# Altium PCB PCB.PcbDoc
Units mm, origin at the board's own origin, x right, y up, seen from the top; angles counter-clockwise.
Board outline 200 x 149.9 mm, 2 copper layers (Top Layer, Bottom Layer); 38 components, 35 nets, 168 pads, 4 vias.
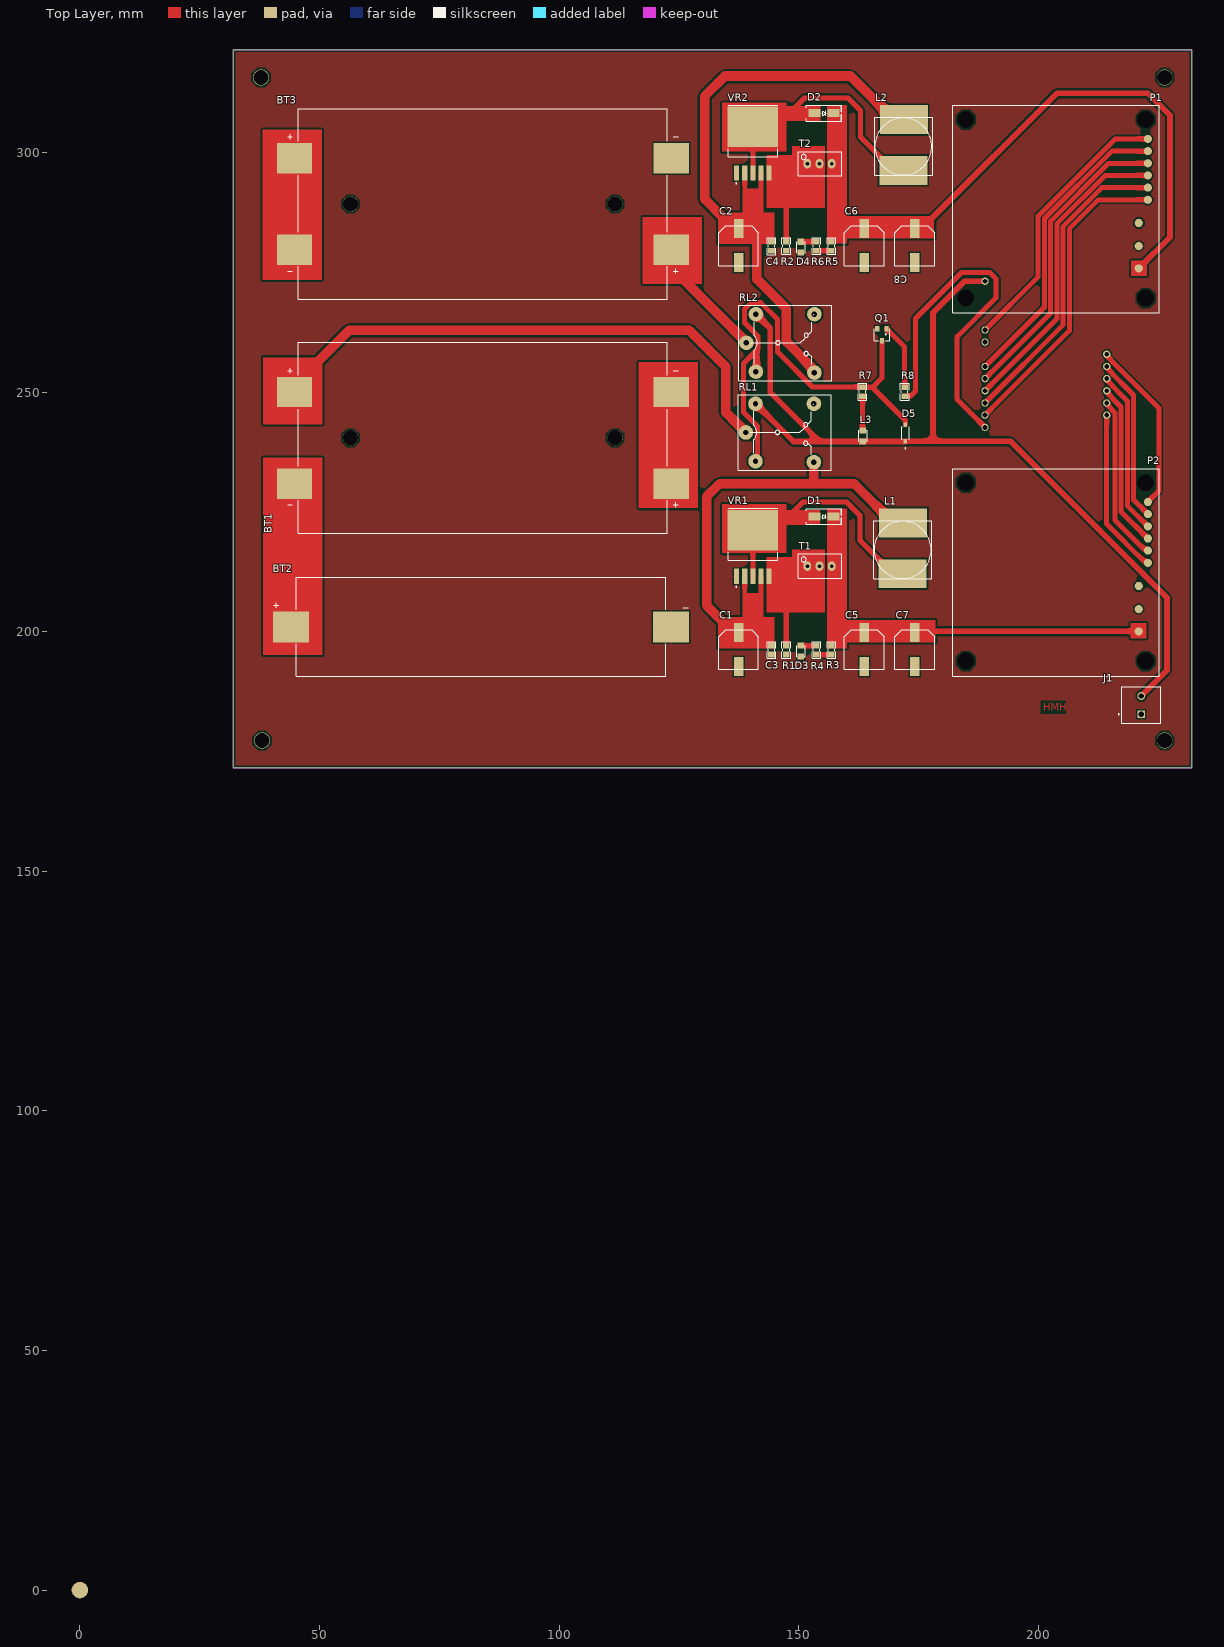
[diagram p0: Top Layer view]
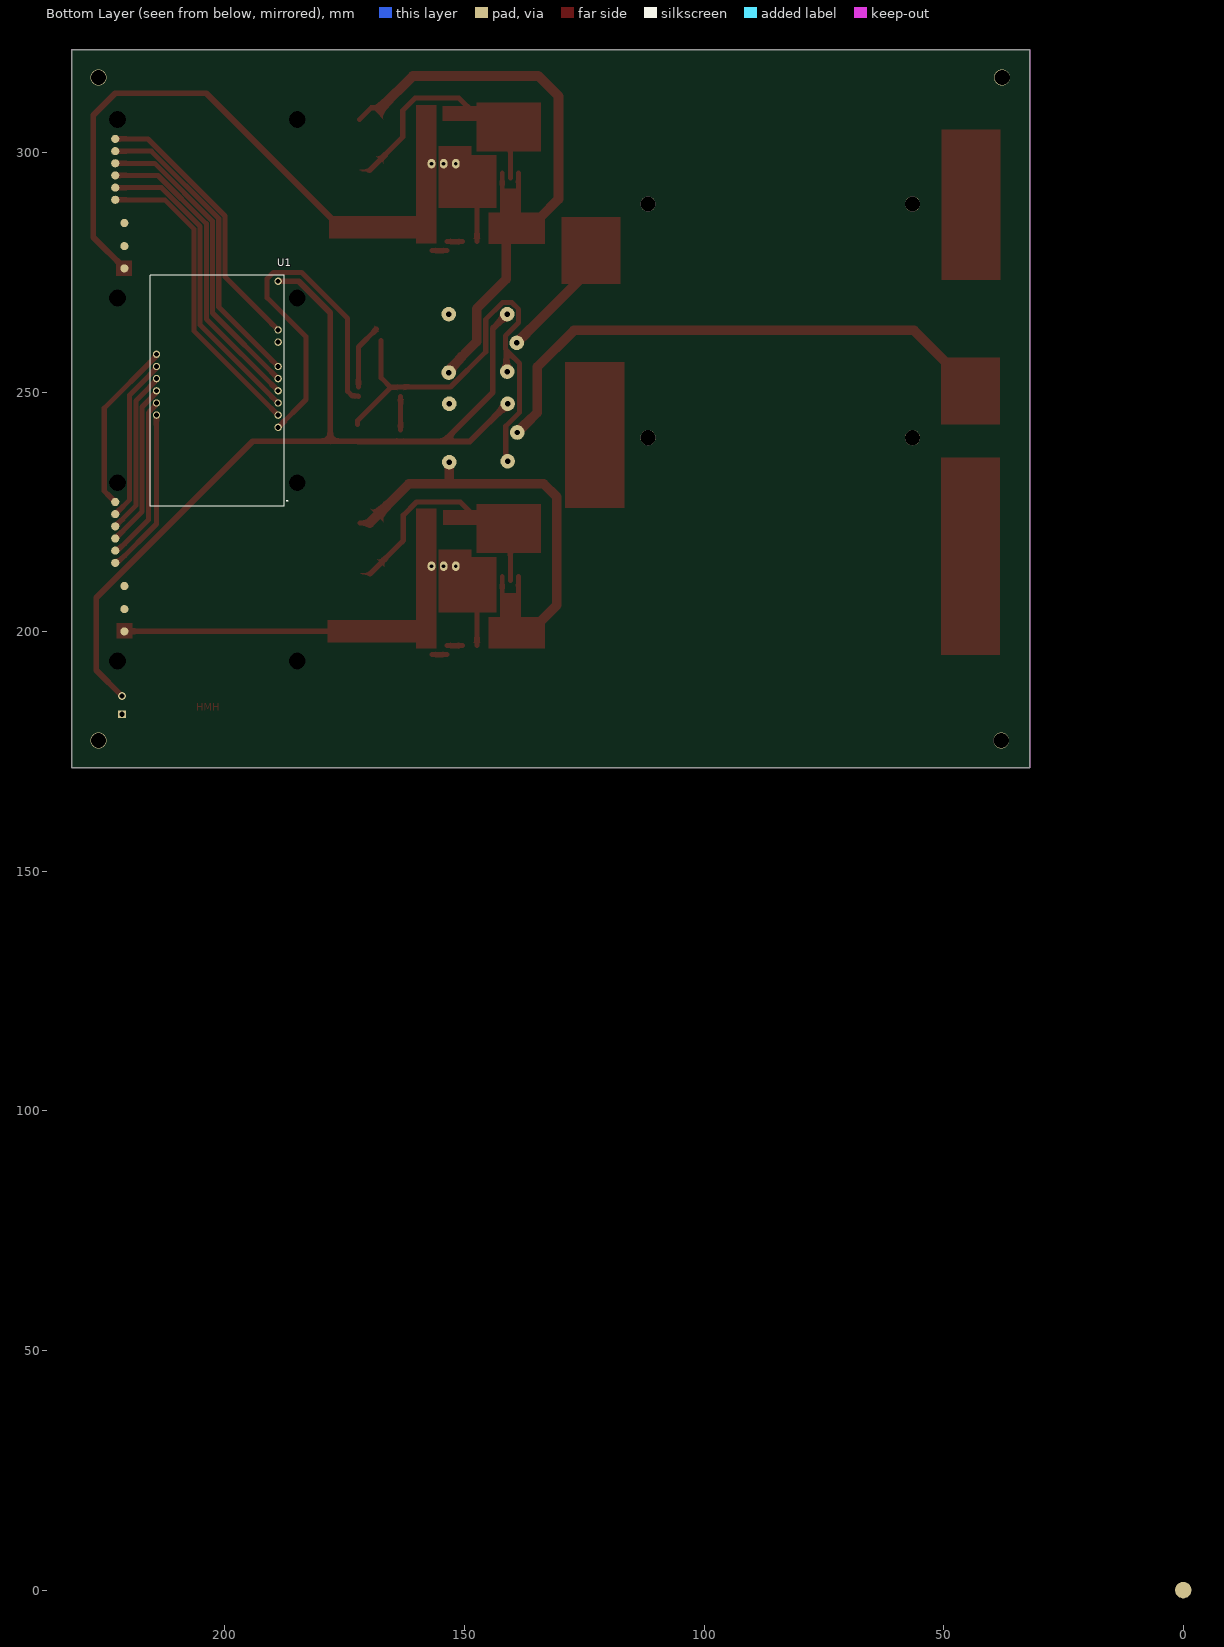
[diagram p1: Bottom Layer view, seen from below]

## Layer stack, top to bottom
Top Solder: solder mask 0.0102, Solder Resist, Dk 3.5
Top Layer: signal copper 0.0356
Dielectric 1: dielectric 0.32, FR-4, Dk 4.8
Bottom Layer: signal copper 0.0356
Bottom Solder: solder mask 0.0102, Solder Resist, Dk 3.5

## Board outline
32,171.6 32,321.5 232,321.5 232,171.6

## Design rules (kind name [scope] priority, off if disabled: settings)
Clearance TB6612FNG [InNet('0')or InNet('33')or InNet('25')or InNet('26')or InNet('27')or InNet('14')or InNet('13')or InNet('4')or InNet('16')or InNet('17')or InNet('5')or InNet('18')or InNet('19')or InNet('3V3')] p1: gap=0.25 ignorepadtopadclearanceinfootprint=FALSE
Clearance [All] p2: gap=0.35 ignorepadtopadclearanceinfootprint=FALSE
PolygonConnect [All] p1: connectstyle=Relief reliefconductorwidth=0.254 reliefentries=4 polygonreliefangle="90 Angle" airgapwidth=0.254
RoutingVias [All] p1: holewidth=0.711 width=1.27 viastyle="Through Hole" minholewidth=0.711 minwidth=1.27 maxholewidth=0.711 maxwidth=1.27
SolderMaskExpansion [All] p1: expansion=0.102 istentingtop=FALSE
Width PIN3 [InNet('PIN3') OR InNet('PIN3N')] p1: maxlimit=1.5 minlimit=0.6 preferedwidth=1
Width GND [InNet('GND')] p2: maxlimit=0.001 minlimit=0.001 preferedwidth=0.001
Width motor [InNet('motor 1') OR InNet('motor 2') OR InNet('motor 3') OR InNet('motor 4') OR InNet('motor 5') OR InNet('motor 6') OR InNet('motor 7') OR InNet('motor 8')] p3: maxlimit=2.5 minlimit=0.9 preferedwidth=0.9
Width "PIN1 + PIN2" [InNet('PIN1') OR InNet('RELAYPIN1') OR InNet('PIN2') OR InNet('RELAYPIN2')] p4: maxlimit=2 minlimit=0.8 preferedwidth=1
Width 12v/1 [InNet('12V/1')] p5: maxlimit=2 minlimit=1 preferedwidth=1.2
Width 12v/2 [InNet('12V/2')] p6: maxlimit=2 minlimit=1 preferedwidth=1.2
Width 5V [InNet('5V')] p7: maxlimit=1.2 minlimit=1.2 preferedwidth=1.2
Width 3V3 [InNet('3V3')] p8: maxlimit=0.5 minlimit=0.3 preferedwidth=0.4
30 further rules are at their usual default settings.

## Classes and differential pairs
component class Sheet: 3 C1 C2 C3 C4 C5 C6 C7 C8 D1 D2 D3 D4 D5 J1 L1 L2 L3 L9 P1 P2 Q1 R1 R2 R3 R4 R5 R6 R7 R8 RL1 RL2 T1 T2 VR1 VR2

## Components (designator, comment, footprint, x,y, rotation, side; value= is the part's Value field where it differs from the comment)
BT1 "1048P" BAT_1048P#1 84.1,240.495 r0 top
BT2 "1042P" BAT_1042P 83.7,201.037 r180 top
BT3 "1048P" BAT_1048P#2 84.1,289.3 r180 top
C1 "220uF/25v" "tu nhom 8 (f)" 137.463,196.3 r270 top
C2 "220uF/25v" "tu nhom 8 (f)" 137.463,280.6 r270 top
C3 "100nF 50V" "Cap 0805" 144.363,196.199 r270 top
C4 "100nF 50V" "Cap 0805" 144.363,280.499 r270 top
C5 "220uF/25v" "tu nhom 8 (f)" 163.701,196.3 r270 top
C6 "220uF/25v" "tu nhom 8 (f)" 163.701,280.6 r270 top
C7 "220uF/25v" "tu nhom 8 (f)" 174.263,196.3 r270 top
C8 "220uF/25v" "tu nhom 8 (f)" 174.263,280.6 r270 top
D1 "SS54" "DIODE SMA" 155.3,224.051 r0 top
D2 "SS54" "DIODE SMA" 155.3,308.251 r0 top
D3 "LED 0805" LED-0805-Red 150.463,197.115 r270 top
D4 "LED 0805" LED-0805-Red 150.463,281.415 r270 top
D5 "1N4148W" SODFL3816X120N 172.3,241.5 r90 top
J1 "284392-2" TE_284392-2 221.5,184.7 r90 top
L1 "33uH-4,2A SMD" "Cuon Cam 12x12x10" 165.713,211.1 r0 top
L2 "33uH-4,2A SMD" "Cuon Cam 12x12x10" 165.851,295.3 r0 top
L3 "LED 0805" LED-0805-Red 163.401,239.732 r90 top
P1 "Motor L298N" L298N_Module 222.9,290.164 r90 top
P2 "Motor L298N" L298N_Module 222.9,214.397 r90 top
Q1 "S8050" SOT-23 167.4,262 r180 top
R1 "1k" "tro smd 0805" 147.363,196.202 r90 top
R2 "1k" "tro smd 0805" 147.363,280.502 r90 top
R3 "1k" "tro smd 0805" 156.763,196.202 r90 top
R4 "1k" "tro smd 0805" 153.763,196.202 r270 top
R5 "1k" "tro smd 0805" 156.763,280.502 r90 top
R6 "1k" "tro smd 0805" 153.763,280.502 r270 top
R7 "1k" "tro smd 0805" 163.401,250.1 r270 top
R8 "470" "tro smd 0805" 172.2,250.1 r270 top
RL1 "Relay" "Relay 5 Chan SRD" 139,241.6 r0 top
RL2 "Relay" "Relay 5 Chan SRD" 139.1,260.3 r0 top
T1 "10k" "Bien Tro Vi Chinh Dung" 154.36,213.7 r0 top
T2 "10k" "Bien Tro Vi Chinh Dung" 154.36,297.7 r0 top
U1 "ESP32-DEVKITC-32U" MODULE_ESP32-DEVKITC-32U 201.6,250.29 r0 bottom
VR1 "XL6009" DPAK170P1435X465-6N 140.453,217.688 r90 top
VR2 "XL6009" DPAK170P1435X465-6N 140.453,301.888 r90 top

## Footprints (in the part's own frame and the unit in brackets; to place one, negate y for a bottom-side part, rotate by r counter-clockwise, add the part's x,y. Pads: shape width x height; smd on the part's side, far side on the other; paste and mask are expansions set on the pad)
BAT_1042P [mm]
  rect 7.46x6.47 smd: N(-39.67,0) P(39.67,0)
  round 0 all layers, no hole: ""(27.6,8) ""(83.7,201.037)
  round 2.39 all layers, no hole: ""(83.7,201.037)
  silkscreen extent -43.25,-10.33 43.25,10.33, body extent -43,-10.33 43,10.33, height 14.86
BAT_1048P#1 [mm]
  rect 7.34x6.35 smd: N1(39.33,9.555) N2(-39.33,-9.555) P1(-39.33,9.555) P2(39.33,-9.555)
  round 2.39 all layers, no hole: ""(-84.1,-240.495)
  round 3.45 all layers, no hole: ""(-84.1,-240.495) ""(-84.1,-240.495)
  round 3.17 hole 3.17 unplated: ""(-27.6,0) ""(27.6,0)
  silkscreen extent -40.75,-19.89 40.75,19.89, body extent -43,-19.89 43,19.89, height 15.43
BAT_1048P#2 [mm]
  rect 7.34x6.35 smd: N1(39.33,9.555) N2(-39.33,-9.555) P1(-39.33,9.555) P2(39.33,-9.555)
  round 3.17 hole 3.17 unplated: ""(-27.6,0) ""(27.6,0)
  round 3.45 all layers, no hole: ""(84.1,289.3) ""(84.1,289.3)
  round 2.39 all layers, no hole: ""(84.1,289.3)
  silkscreen extent -40.75,-19.89 40.75,19.89, body extent -43,-19.89 43,19.89, height 15.43
"Bien Tro Vi Chinh Dung" [mm] "Bien tro vi chinh"
  oval 1.6x2 hole 0.8: 1(-2.54,0) 2(0,0) 3(2.54,0)
  silkscreen extent -4.47,-2.54 4.6,2.54, body extent -4.54,-2.4 4.66,2.4, height 12.02
"Cap 0805" [mm] "Compoment SMD 80x50mil"
  rect 1.2x1.4 smd: 1(-0.946,-0.003) 2(0.954,-0.003)
  silkscreen extent -1.75,-0.89 1.75,0.89, body extent -0.97,-0.61 1.03,0.64, height 1.23
"Cuon Cam 12x12x10" [mm] "Cuon Cam 12x12x10"
  rect 10x6 smd: 1(6.1,11.6) 2(6,1)
  silkscreen extent 0,0 12.1,12.1, body extent 0.1,-0.2 12.1,12.14, height 7.51
"DIODE SMA" [mm] "SMA"
  rect 2.5x1.7 smd: 1(-2,0) 2(2,0)
  silkscreen extent -3.68,-1.65 3.75,1.65, body extent -2.6,-1.37 2.6,1.37, height 2.4
DPAK170P1435X465-6N [mm]
  rect 3.21x1.05 smd: 1(-6.13,3.4) 2(-6.13,1.7) 3(-6.13,0) 4(-6.13,-1.7) 5(-6.13,-3.4)
  rect 8.46x10.53 smd paste-6: 6(3.5,0)
  silkscreen extent -8.4,-5.18 8.05,5.18, body extent -7.17,-5.08 7.17,5.08, height 4.65
L298N_Module [mm]
  round 1.7 all layers, no hole: 1(0,0) 2(2.54,0) 3(5.08,0) 4(7.62,0) 5(10.16,0) 6(12.7,0) 7(-14.301,1.905) 8(-9.661,1.905) 9(-4.841,1.905)
  round 1.524 hole 3.5: 16(-20.518,0.476) 17(-20.518,38) 18(16.736,38) 19(16.736,0.476)
  silkscreen extent -23.62,-2.41 19.68,40.77, body extent -23.69,-2.7 19.81,40.8, height 26
LED-0805-Red [mil]
  rect 50x55 smd: 1(0,0) 2(90,0)
  silkscreen extent 0,-35 90,35, body extent 5,-25 85,25, height 43
MODULE_ESP32-DEVKITC-32U [mm]
  rect 1.53x1.53 / inner round 1.53 / far side rect 1.53x1.53 all layers, no hole: 1(-201.6,250.29)
  round 1.53 all layers, no hole: 2(-201.6,250.29) 3(-201.6,250.29) 4(-201.6,250.29) 5(-201.6,250.29) 6(-201.6,250.29) 13(-201.6,250.29) 16(-201.6,250.29) 17(-201.6,250.29) 18(-201.6,250.29) 20(-201.6,250.29) 21(-201.6,250.29) 22(-201.6,250.29) 23(-201.6,250.29) 24(-201.6,250.29) 25(-201.6,250.29) 32(-201.6,250.29) 33(-201.6,250.29) 34(-201.6,250.29) 35(-201.6,250.29) 36(-201.6,250.29) 37(-201.6,250.29) 38(-201.6,250.29)
  round 1.53 hole 1.02: 7(-12.7,7.61) 8(-12.7,5.07) 9(-12.7,2.53) 10(-12.7,-0.01) 11(-12.7,-2.55) 12(-12.7,-5.09) 14(-12.7,-10.17) 15(-12.7,-12.71) 19(-12.7,-22.87) 26(12.7,-7.63) 27(12.7,-5.09) 28(12.7,-2.55) 29(12.7,-0.01) 30(12.7,2.53) 31(12.7,5.07)
  silkscreen extent -14.67,-24.1 13.95,24.1, body extent -13.95,-24.62 13.95,24.13, height 7.85
"Relay 5 Chan SRD" [mil] "Relay SPDT, 5 pin, 10A,W 650mil, L 800mil, H 800mil"
  round 120 hole 45: 1(0,0) 2(559.06,236.22) 3(559.06,-243.78) 4(78.74,-236.22) 5(78.74,236.22)
  silkscreen extent -63,-311 700,310, body extent -55,-306 697,304, height 602
SODFL3816X120N [mm]
  rect 0.97x0.73 smd paste+0 mask+0.102: A(1.72,0) C(-1.72,0)
  silkscreen extent -3.3,-0.8 1.35,0.8, body extent -1.94,-0.88 1.86,0.72, height 1.1
SOT-23 [mm] "SOT 23 _ 1-3-2"
  rect 0.85x1.2 smd: 1(-0.94,-1.245) 2(0.985,-1.25) 3(0.005,1.25)
  silkscreen extent -1.65,-1.27 1.65,1.27, body extent -1.47,-1.33 1.53,1.17, height 1.06
TE_284392-2 [mm]
  rect 1.65x1.65 / inner round 1.65 / far side rect 1.65x1.65 hole 1.1: 1(-1.905,0)
  round 1.65 hole 1.1: 2(1.905,0)
  silkscreen extent -3.8,-4.1 3.8,4.8, body extent -4.01,-4.1 4.11,4.1, height 14
"tro smd 0805" [mm]
  rect 1.2x1.4 smd: 1(-0.946,-0.061) 2(0.954,-0.061)
  silkscreen extent -1.75,-0.97 1.75,0.84, body extent -1.56,-0.76 1.44,0.64, height 0.53
"tu nhom 8 (f)" [mm]
  rect 4x2 smd: 1(-3.55,0) 2(3.55,0)
  silkscreen extent -4.15,-4.15 4.15,4.15, body extent -4.85,-4.25 4.85,4.25, height 10.5

## Part data
BT1 BT3: "SMT Polarized Holder for Dual 18650 Batteries", Package=None, Availability="In Stock", Check_prices=https://www.snapeda.com/parts/1048P/Keystone+Electronics/view-part/?ref=eda, MF="Keystone Electronics", MP=1048P, Price=None, Purchase-URL=https://pricing.snapeda.com/search/part/1048P/?ref=eda, SnapEDA_Link=https://www.snapeda.com/parts/1048P/Keystone+Electronics/view-part/?ref=snap
BT2: "SMT Polarized Battery Holder for 18650 Battery", Package=None, Check_prices=https://www.snapeda.com/parts/1042P/Keystone/view-part/?ref=eda, MF="Keystone Electronics", MP=1042P, SnapEDA_Link=https://www.snapeda.com/parts/1042P/Keystone/view-part/?ref=snap
C1 C2 C5 C6 C7 C8: library part "Tu Nhom 220uF 25V", "Dán", Chung_Loai=Dán, Don_Vi=Con, Ma_Hang=MH002221, So_Chan=2, Ten_Linh_Kien="Tụ Nhôm 220uF 25V"
C3 C4: library part "Cap 0805", "Capacitor SMD 0805"
D1 D2: library part "Diode SS34 ( 1N5822 )", "Dán", Chung_Loai=Dán, Don_Vi=Con, Ma_Hang=MH002104, Ten_Linh_Kien="Diode SS34 3A 40V SMA ( 1N5822 SS34A)"
D3 D4 L3: library part "LED 0805 Do", "Dán", Chung_Loai=Dán, Don_Vi=Con, Ma_Hang=MH000897, Ten_Linh_Kien="LED 0805 Màu Đỏ (Red)"
D5: "Small Signal Diode, SOD-123F, 100V, 0.15A, 150Â°C", Package="SOD-123F Diotec", Check_prices=https://www.snapeda.com/parts/1N4148W/Diotec/view-part/?ref=eda, MF="Diotec Semiconductor", MP=1N4148W, SnapEDA_Link=https://www.snapeda.com/parts/1N4148W/Diotec/view-part/?ref=snap
J1: "TERMI-BLOK PCB SIDE ENTRY STAC", Package=None, Check_prices=https://www.snapeda.com/parts/284392-2/TE+Connectivity+AMP+Connectors/view-part/?ref=eda, EU_RoHS_Compliance="Compliant with Exemptions", MF="TE Connectivity", MP=284392-2, SnapEDA_Link=https://www.snapeda.com/parts/284392-2/TE+Connectivity+AMP+Connectors/view-part/?ref=snap
L1 L2: library part "CUON CAM 100uH SMD", "Dán", Chung_Loai=Dán, Don_Vi=Con, Ten_Linh_Kien="Cuộn Cảm 100uH 7x7x4MM CD74"
Q1: library part SMD-TRANSISTORS-NPN-25V-500MW(SOT-23), "Bipolar (BJT) Transistor NPN 25 V 500 mA 150MHz 300 mW Surface Mount SOT-23", Package=None, Availability="In Stock", Check_prices=https://www.snapeda.com/parts/S8050/Umwelt+Sensor+Teknik/view-part/?ref=eda, MF=UMW, MP=S8050, Price=None, Purchase-URL=https://pricing.snapeda.com/search/part/S8050/?ref=eda, SnapEDA_Link=https://www.snapeda.com/parts/S8050/Umwelt+Sensor+Teknik/view-part/?ref=snap
R1 R2 R3 R4 R5 R6 R7 R8: library part "Tro 0805 1% 1k", "Dán", Chung_Loai=Dán, Don_Vi=Con, Ma_Hang=MH005468, So_Chan=2, Ten_Linh_Kien="Trở 0805 1% 1k"
RL1 RL2: library part "Relay 5 Chan SRD", "Relay 5 Chan", Ma_Hang=MH009374, Ten="Relay 5V10A SRD-05VDC-SL-C Chính Hãng"
T1 T2: library part "Bien Tro Tinh Chinh 10K Dung", "Cắm", Chung_Loai=Cắm, Don_Vi=Con, Ma_Hang=MH003232, Ten_Linh_Kien="Biến Trở VR 103-10K 3296W"
U1: "ESP32-WROOM-32UE series Transceiver; 802.11 b/g/n (Wi-Fi, WiFi, WLAN), Bluetooth® Smart Ready 4.x Dual Mode Evaluation Board", Package="CUSTOM-38 ESPRESSIF", Check_prices=https://www.snapeda.com/parts/ESP32-DEVKITC-32U/Espressif+Systems/view-part/?ref=eda, MF="Espressif Systems", MP=ESP32-DEVKITC-32U, SnapEDA_Link=https://www.snapeda.com/parts/ESP32-DEVKITC-32U/Espressif+Systems/view-part/?ref=snap
VR1 VR2: "The XL6009 regulator is a wide input range, current mode, DC/DC converter which is capable of generating either positive or negative output voltages.", Package="TO-263-5L XLSEMI", Availability="Not in stock", Check_prices=https://www.snapeda.com/parts/XL6009/XLSEMI/view-part/?ref=eda, MF=XLSEMI, MP=XL6009, Price=None, SnapEDA_Link=https://www.snapeda.com/parts/XL6009/XLSEMI/view-part/?ref=snap

## Via types
v1: diameter 3.3, hole 3.2, Top Layer to Bottom Layer, 4 vias

## Nets (pads, with @x,y where several pads share a name; then routed paths per layer and width w, separated by ;. In a path a pad name is that pad's centre, name@x,y a point inside that pad or via, vN(x,y) a via of type N, cw(c..) or ccw(c..) an arc to the next point about the centre after c; other vN are vias at no path point)
4: P2.6 U1.26 | length 36.3
  Top Layer w1.05: U1.26 214.392,257.828 214.392,257.466 225.2,246.658 225.2,229.397 P2.6
5: P2.3 U1.29 | length 34.4
  Top Layer w1.05: U1.29 214.392,250.208 214.392,249.846 217.3,246.938 217.3,233.257 217.299,233.256 217.299,229.011 217.3,229.01 217.3,225.077 P2.3
5V: D5.C J1.2 L3.1 RL1.5 RL2.5 U1.19 | length 197.9
  Top Layer w1.2: RL1.5 148.905,239.695 ; RL2.5 144.1,263.3 144.1,249.932 154.332,239.7 ; 148.905,239.7 154.332,239.7 ; L3.1@163.401,239.7 154.332,239.7 ; L3.1 D5.C@172.252,239.732 ; D5.C 178.041,239.78 ; U1.19 184.596,273.16 178.041,266.605 178.041,239.78 ; J1.2 226.88,191.985 226.88,207.12 194.22,239.78 178.041,239.78
12V/1: C5.1 C7.1 D1.2 P2.7 R3.2 T1.3 | length 43.7
  Top Layer w1.2: R3.2 R3.2@156.862,197.156 ; T1.3@156.862,213.662 T1.3 ; 177.6,200.5 177.6,200.496 178,200.096 P2.7
12V/2: C6.1 C8.1 D2.2 P1.7 R5.2 T2.3 | length 102.2
  Top Layer w1.2: T2.3@156.824,297.932 158,299.108 158,300.5 ; 176.9,283.5 176.9,284.3 ; 176.9,285.4 177.7,286.2 203.9,312.4 222.9,312.4 227.5,307.8 227.5,282.368 P1.7
13: P1.6 U1.15 | length 57.9
  Top Layer w1.05: U1.15 200,274.1 200,286.792 216.072,302.864 P1.6
14: P1.5 U1.12 | length 63.4
  Top Layer w1.05: U1.12 201.3,267.78 201.3,286.254 215.37,300.324 P1.5
16: P2.5 U1.27 | length 34.4
  Top Layer w1.05: U1.27 214.392,255.288 214.392,254.926 219.9,249.418 219.9,232.18 219.899,232.179 219.899,230.088 219.9,230.087 219.9,227.557 P2.5
17: P2.4 U1.28 | length 34.4
  Top Layer w1.05: U1.28 214.392,252.748 214.392,252.386 218.6,248.178 218.6,232.719 218.599,232.718 218.599,229.549 218.6,229.548 218.6,226.317 P2.4
18: P2.2 U1.30 | length 34.7
  Top Layer w1.05: U1.30 214.392,247.668 214.392,247.306 216,245.698 216,233.796 215.999,233.795 215.999,228.472 216,228.471 216,223.331 222.27,217.062 222.776,217.062 P2.2
19: P2.1 U1.31 | length 34.7
  Top Layer w1.05: U1.31 214.3,222.491 222.27,214.522 222.776,214.522 P2.1
25: P1.2 U1.9 | length 64.7
  Top Layer w1.05: U1.9 205.2,264.06 205.2,284.638 213.266,292.704 P1.2
26: P1.3 U1.10 | length 64.3
  Top Layer w1.05: U1.10 203.9,265.3 203.9,285.177 213.967,295.244 P1.3
27: P1.4 U1.11 | length 63.8
  Top Layer w1.05: U1.11 202.6,266.54 202.6,285.715 214.669,297.784 P1.4
32: R8.2 U1.7 | length 76
  Top Layer w1.05: R8.2 172.214,249.221 173.421,249.221 174.4,250.2 174.4,265.4 184,275 189.9,275 191.2,273.7 191.2,269.7 183.1,261.6 183.1,248.48 U1.7
33: P1.1 U1.8 | length 65
  Top Layer w1.05: U1.8@188.96,245.28 206.5,262.82 206.5,284.1 212.564,290.164 P1.1
GND: BT2.N BT3.N2 C1.2 C2.2 C3.2 C4.2 C5.2 C6.2 C7.2 C8.2 D3.2 D4.2 J1.1 P1.8 P2.8 Q1.2 R1.1 R2.1 U1.14 VR1.1 VR2.1
NetBT1_N1: BT1.N1 BT1.P2
NetBT1_N2: BT1.N2 BT2.P
NetBT3_N1: BT3.N1 BT3.P2
NetD1_1: D1.1 L1.2 VR1.3 VR1.6 | length 45.2
  Top Layer w0.254: D1.1 D1.1@153.533,224.283 ; 162.8,219.1 163,218.9 163,218.813 ; L1.2@169.713,212.1 L1.2
  Top Layer w1.05: VR1.3@140.453,210.733 VR1.6
  Top Layer w1.1: 147.9,224.1 150.9,227.1 160,227.1 162.8,224.3 162.8,219.1 ; 163,218.813 L1.2@169.713,212.1
NetD2_1: D2.1 L2.2 VR2.3 VR2.6 | length 61.8
  Top Layer w0.254: VR2.6@138.553,305.388 141.415,308.251 148.051,308.251 D2.1 D2.1@153.733,308.683 ; L2.2@169.851,296.3 L2.2
  Top Layer w1.05: VR2.3@140.453,294.7 VR2.3 VR2.6
  Top Layer w1.1: 148.051,308.251 151.2,311.4 160.3,311.4 162.9,308.8 162.9,303.251 L2.2@169.851,296.3
NetD3_1: D3.1 R4.1 | length 3.3
  Top Layer w0.254: R4.1@153.67,197.115 R4.1
  Top Layer w1.05: D3.1 R4.1@153.67,197.115
NetD4_1: D4.1 R6.1 | length 3.3
  Top Layer w0.254: R6.1@153.67,281.415 R6.1
  Top Layer w1.05: D4.1 R6.1@153.67,281.415
NetD5_A: D5.A Q1.3 R7.1 RL1.4 RL2.4 | length 99.8
  Top Layer w1.05: RL1.4 141.382,235.982 141.382,237.196 141.4,237.214 141.4,242.9 138.5,245.8 138.5,256 141.3,258.8 ; RL2.4 141.3,254.5 141.3,258.8 ; 165.354,251.046 R7.1 163.286,251.1 152.915,251.1 145.575,258.44 145.575,265.218 142.094,268.699 140.106,268.699 138.701,267.294 138.701,264.545 141.499,261.747 141.499,258.999 141.3,258.8 ; Q1.3 167.395,252.995 165.4,251 172.3,244.1 D5.A
NetL3_2: L3.2 R7.2 | length 7.2
  Top Layer w0.254: L3.2@163.34,242.078 L3.2
  Top Layer w1.05: L3.2@163.34,242.078 R7.2
NetQ1_1: Q1.1 R8.1 | length 13.8
  Top Layer w1.05: Q1.1 172.139,259.445 R8.1
NetR1_2: R1.2 T1.1 T1.2 VR1.5 | length 10.9
  Top Layer w0.254: 147.4,208 147.424,207.976
  Top Layer w1.1: R1.2 147.424,207.976
NetR2_2: R2.2 T2.1 T2.2 VR2.5 | length 13.4
  Top Layer w0.254: 147.3,294.8 147.424,294.676
  Top Layer w1.1: R2.2 147.424,294.676
NetR3_1: R3.1 R4.2 | length 3.1
  Top Layer w0.254: R3.1@156.815,195.248 R3.1
  Top Layer w1.05: R4.2 R3.1@156.815,195.248
NetR5_1: R5.1 R6.2 | length 3.1
  Top Layer w0.254: R5.1@156.815,279.547 R5.1
  Top Layer w1.05: R6.2 R5.1@156.815,279.547
PIN1: BT1.P1 RL1.1 | length 106.5
  Top Layer w2: 49.6,256.3 56.2,262.9 127.2,262.9 134.826,255.274 134.826,245.774 RL1.1
PIN2: BT3.P1 RL2.1 | length 27
  Top Layer w1: BT3.P1@123.6,279.6 122.93,279.6 123.844,278.686 123.844,275.656
  Top Layer w2: 123.844,275.656 RL2.1@139.4,260.1
RELAYPIN1: C1.1 C3.1 L1.1 RL1.3 VR1.2 VR1.4 | length 101.9
  Top Layer w1: C1.1@136.853,201.46 137.463,200.85 C1.1 ; VR1.2 138.753,202.047 138.8,202 ; 140.253,199.847 140.3,199.8 ; VR1.4 142.153,201.847 142.2,201.8 ; L1.1@169.813,222.7 L1.1
  Top Layer w2: 136.3,200 130.8,205.5 130.8,228.2 133.5,230.9 153.2,230.9 ; RL1.3@153.2,235.516 153.2,230.9 ; L1.1@169.813,222.7 161.613,230.9 153.2,230.9
RELAYPIN2: C2.1 C4.1 L2.1 RL2.3 VR2.2 VR2.4 | length 135.1
  Top Layer w1: C2.1@136.853,285.76 137.463,285.15 C2.1 C2.1@137.313,284 ; C2.1@137.463,284.2 139.1,284.2 ; 138.7,285.1 138.753,285.153 VR2.2 ; VR2.4 142.153,286.947 142.4,286.7 ; L2.1@167.4,309.4 169.451,309.4 L2.1
  Top Layer w1.05: 140.175,284.931 140.253,284.853
  Top Layer w2: C2.1@137.313,284 134.813,286.5 134.2,286.5 130.4,290.3 130.4,311.8 134.6,316 160.8,316 L2.1@167.4,309.4 ; 141.3,282.1 141.3,273.6 147.45,267.45 147.45,260.55 152.776,255.224 152.776,254.916 RL2.3@153.784,253.907
pads on no net: BT1. BT2. BT3. P1.9 P1.16 P1.17 P1.18 P1.19 P2.9 P2.16 P2.17 P2.18 P2.19 RL1.2 RL2.2 U1.1 U1.2 U1.3 U1.4 U1.5 U1.6 U1.13 U1.16 U1.17 U1.18 U1.20 U1.21 U1.22 U1.23 U1.24 U1.25 U1.32 U1.33 U1.34 U1.35 U1.36 U1.37 U1.38
copper on no net:
  other v1: 38,177.3 226.4,177.3 37.8,315.7 226.4,315.7

## Polygon pours and split planes (outlines as drawn)
GND on Top Layer "GND_L01_P000" (solid, remove dead copper, pour order 0): 32,321.5 32,171.6 232,171.6 232,321.5

## Keep-outs
Keep-Out Layer:
  the board outline again, w0.254

## Other copper
Top Layer:
  rectangle net NetBT1_N2: 38.2,195.2 50.6,236.4
  rectangle net NetBT1_N1: 116.6,225.8 129,256.3
  rectangle net NetBT3_N1: 38.1,273.4 50.5,304.8
  rectangle net NetD2_1: 134,300.2 147.5,310.5
  rectangle net NetD1_1: 134,216.4 147.5,226.7
  rectangle net RELAYPIN1: 138.3,202.9 142.5,208.1
  rectangle net RELAYPIN2: 138.4,287.3 142.6,292.5
  rectangle net 12V/2: 219.4,274.3 222.7,277.5
  rectangle net 12V/1: 219.3,198.6 222.6,201.8
  rectangle net PIN2: 117.4,272.6 129.8,286.6
  rectangle net PIN1: 38.2,243.3 50.6,257.3
  rectangle net 12V/2: 156.7,282.1 178.3,286.8
  rectangle net 12V/1: 156.6,197.8 178.6,202.5
  rectangle net NetD2_1: 143,306.6 154.6,309.7
  rectangle net NetD1_1: 142.9,222.3 154.5,225.4
  rectangle net NetR2_2: 143.3,288.5 155.468,299.5
  rectangle net NetR2_2: 148.568,295.459 155.468,301.359
  rectangle net NetR1_2: 143.3,204 155.468,215.6
  rectangle net NetR1_2: 148.568,211.259 155.468,217.159
  rectangle net 12V/2: 155.9,281 160.1,309.9
  rectangle net 12V/1: 155.9,196.5 160.1,225.7
  rectangle net RELAYPIN1: 133.2,196.5 145,203.1
  rectangle net RELAYPIN2: 133.2,280.9 145,287.5
  text "HMH" at 201.1,183.5 h1.52